# Altium PCB NEXUS32.PcbDoc (part 2 of 3)
Units mil, origin at the board's own origin, x right, y up, seen from the top; angles counter-clockwise.
Board outline 6299 x 4724 mil, 4 copper layers (Top Layer, L2_GND, L3_PWR, Bottom Layer), stack 63.6 mil thick; 220 components, 128 nets, 690 pads, 369 vias.
Unrouted connection lines stored in the file: 1.
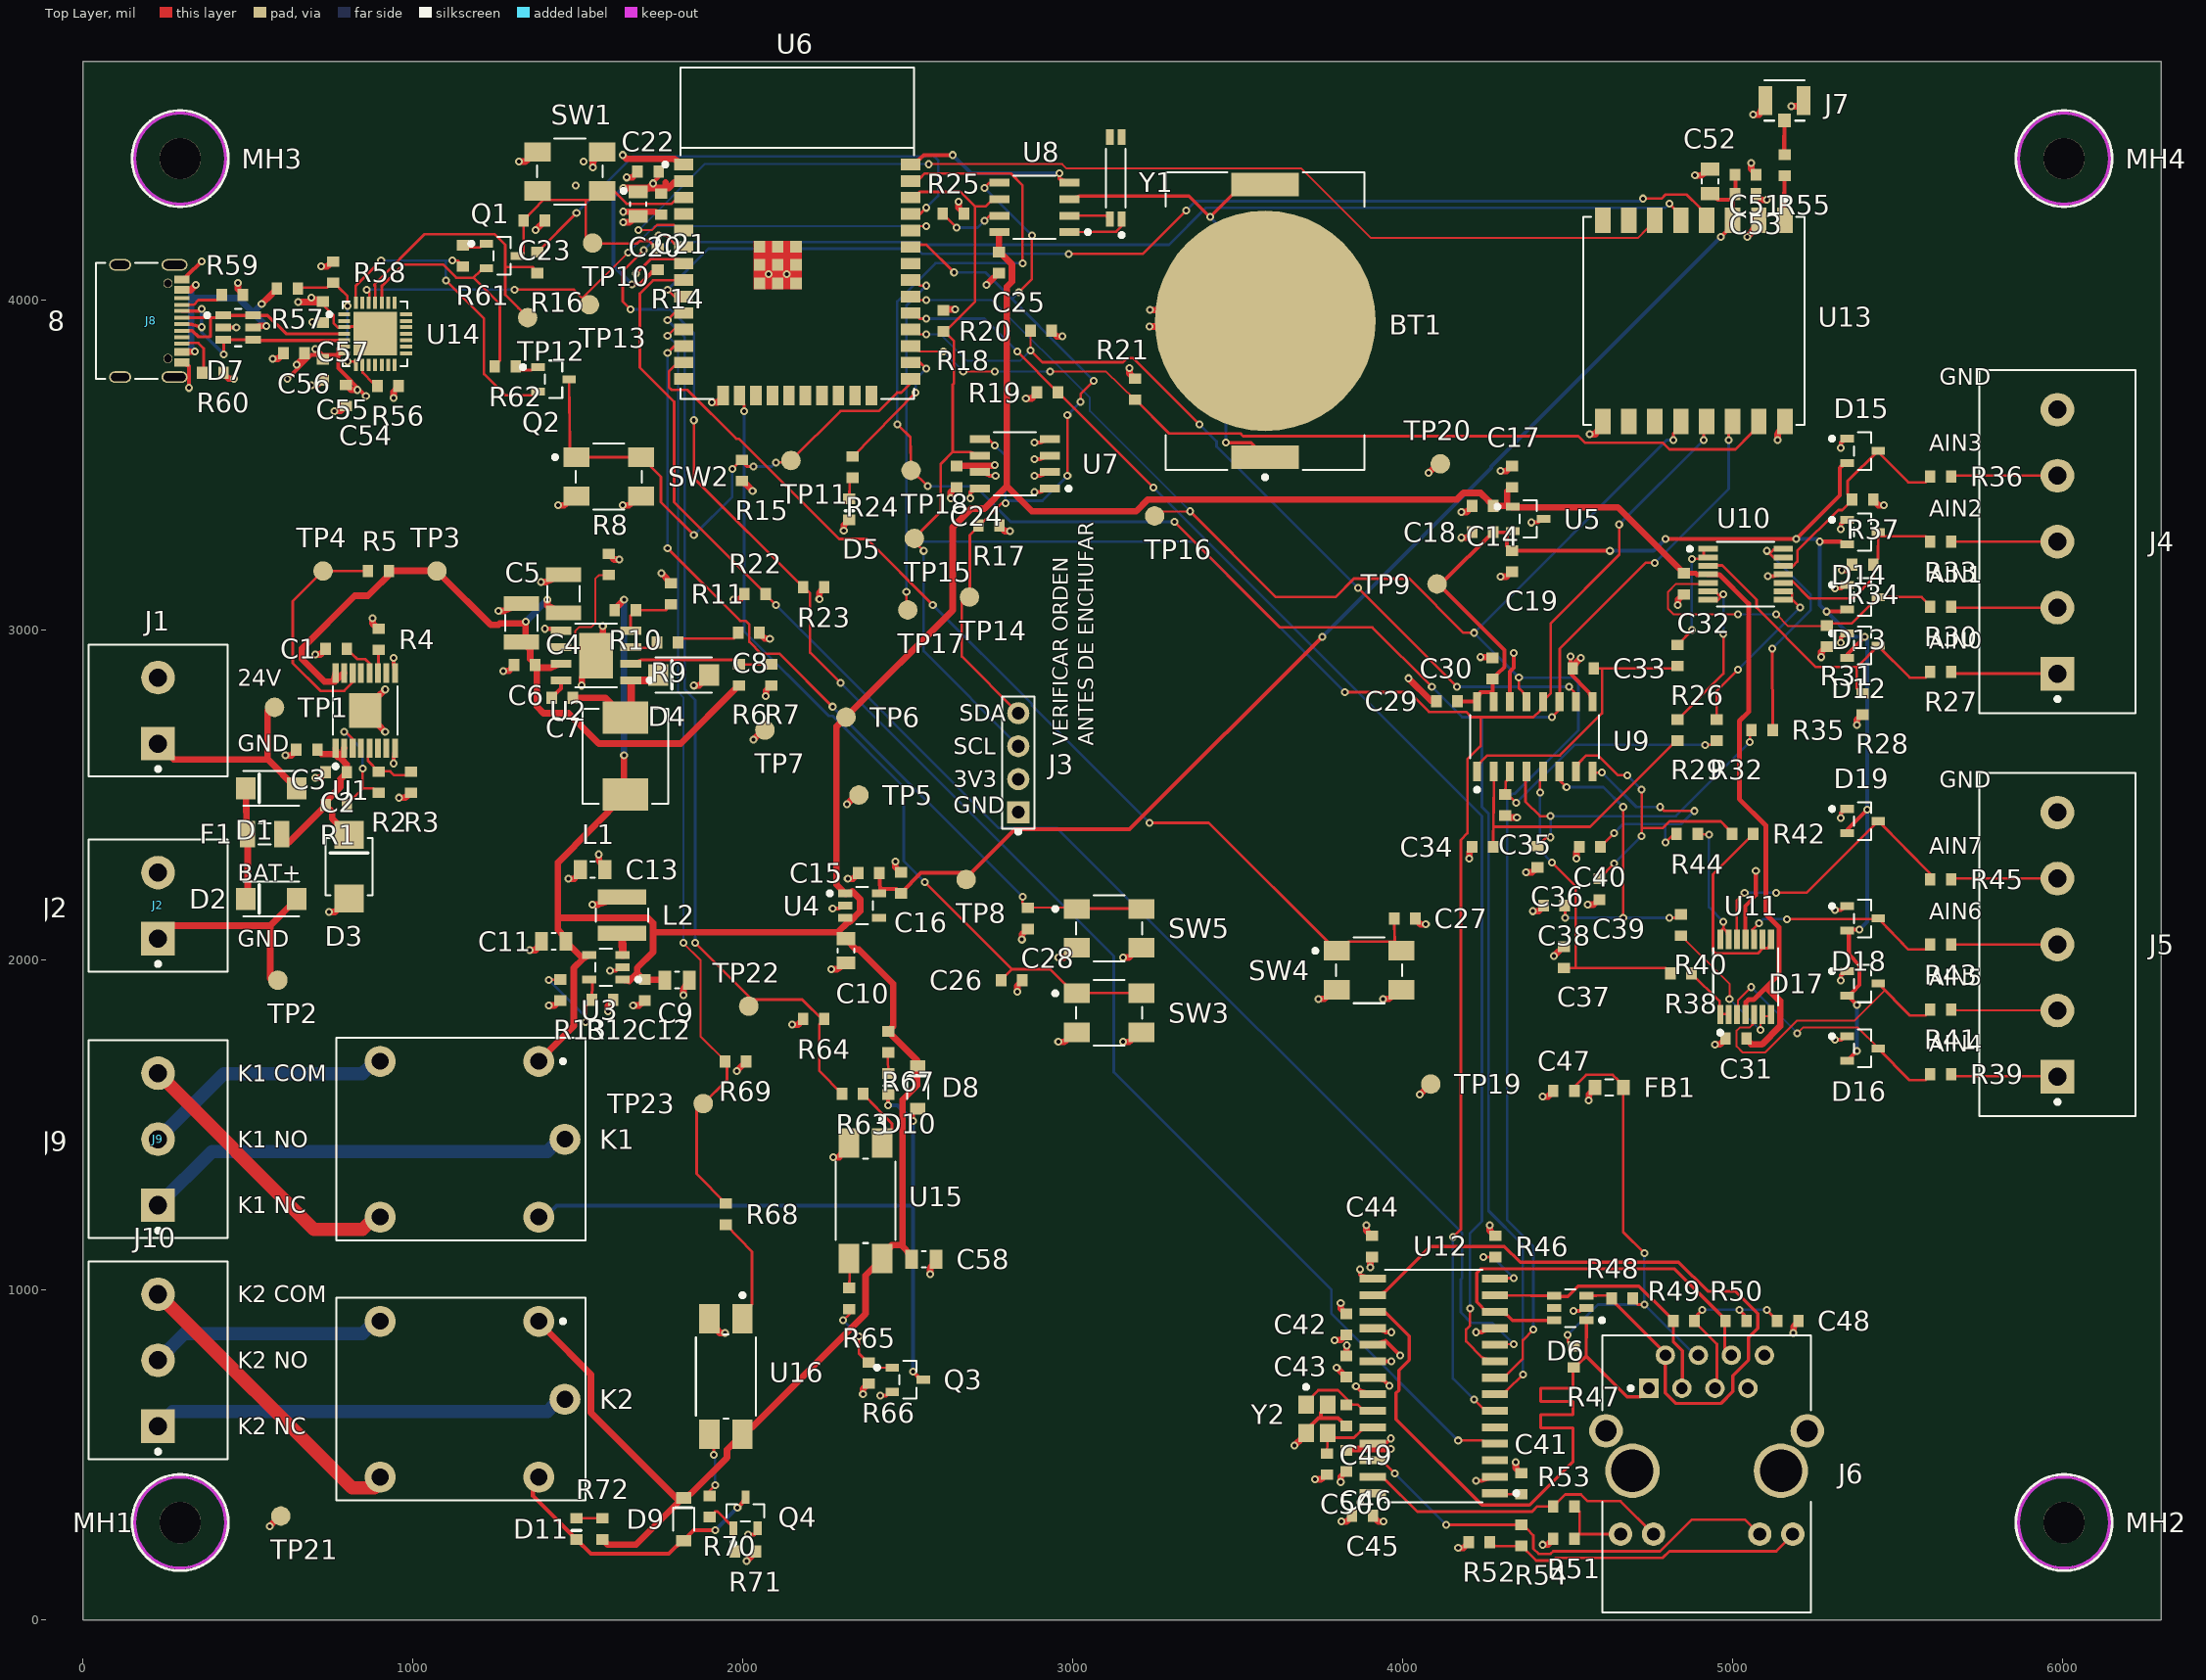
[diagram p0: Top Layer view]

## Part data (continued)
U13: "Modulo LoRa SX1276 803-930MHz SMD-16 (Ai-Thinker Ra-01H)", LCSC Part #=C503593, Manufacturer=Ai-Thinker, Datasheet=https://wmsc.lcsc.com/wmsc/upload/file/pdf/v2/lcsc/2004022132_Ai-Thinker-Ra-01H_C503593.pdf, Manufacturer Part Number=Ra-01H, Supplier 1=LCSC, Supplier Part Number 1=C503593
U14: "Puente USB a UART QFN-28 5x5 (Silicon Labs CP2102N-A02-GQFN28R)", LCSC Part #=C964632, Manufacturer="Silicon Labs", Datasheet=https://wmsc.lcsc.com/wmsc/upload/file/pdf/v2/lcsc/2304140030_SKYWORKS-SILICON-LABS-CP2102N-A02-GQFN28R_C964632.pdf, Manufacturer Part Number=CP2102N-A02-GQFN28R, Supplier 1=LCSC, Supplier Part Number 1=C964632
U15 U16: "Optoacoplador fototransistor 5kV SMD-4 (Sharp PC817X2CSP9F)", LCSC Part #=C66405, Manufacturer=Sharp, Datasheet=https://wmsc.lcsc.com/wmsc/upload/file/pdf/v2/lcsc/2304140030_Sharp-Microelectronics-PC817X2CSP9F_C66405.pdf, Manufacturer Part Number=PC817X2CSP9F, Supplier 1=LCSC, Supplier Part Number 1=C66405
Y1: library part XTAL_MC146, "Cristal 32.768kHz 12.5pF MC-146 (Epson Q13MC14620002); terminales #1 y #4, #2/#3 sin conexion", LCSC Part #=C15482, Manufacturer=Epson, Manufacturer Part Number=Q13MC14620002, Datasheet=https://wmsc.lcsc.com/wmsc/upload/file/pdf/v2/lcsc/2404180924_Seiko-Epson-Q13MC14620002_C15482.pdf, Supplier 1=LCSC, Supplier Part Number 1=C15482
Y2: library part XTAL_3225, "Cristal 25MHz 12pF SMD 3225 4 pads (YXC X322525MOB4SI); terminales 1 y 3, carcasa 2 y 4 a GND", LCSC Part #=C9006, Manufacturer="YXC (Yangxing Technology)", Manufacturer Part Number=X322525MOB4SI, Datasheet=https://wmsc.lcsc.com/wmsc/upload/file/pdf/v2/lcsc/2403291504_YXC-Crystal-Oscillators-X322525MOB4SI_C9006.pdf, Supplier 1=LCSC, Supplier Part Number 1=C9006

## Via types
v1: diameter 24, hole 12, Top Layer to Bottom Layer, tented both sides, 369 vias

## Nets (pads, with @x,y where several pads share a name; then routed paths per layer and width w, separated by ;. In a path a pad name is that pad's centre, name@x,y a point inside that pad or via, vN(x,y) a via of type N, cw(c..) or ccw(c..) an arc to the next point about the centre after c; other vN are vias at no path point)
AIN0: J4.1 R27.1 | length 323.2
  Top Layer w8: R27.1@5662,2874 5676,2868 J4.1@5984,2868
AIN0_DIV: D12.3 R27.2 R28.1 U10.3 | length 979.2
  Top Layer w8: U10.3@4925,3195 4952,3196 4968,3196 5072,3092 5072,3068 5252,2888 5376,2888 ; R28.1@5394,2808 5376,2824 5376,2888 ; D12.3@5440,2952 5536,2856 5584,2856 R27.2@5598,2874 ; D12.3@5441,2953 5376,2888
AIN1: J4.2 R30.1 | length 322.3
  Top Layer w8: R30.1@5662,3071 5676,3068 J4.2@5984,3068
AIN1_DIV: D13.3 R30.2 R31.1 U10.5 | length 1043.9
  Top Layer w6: U10.5@4925,3143 4896,3140 4828,3140 4804,3116 4804,3064 4820,3048 v1(5016,3048) ; v1(5132,3048) 5168,3012 R31.1@5284,3012
  Top Layer w8: R31.1@5285,3014 5300,3020 5360,3020 D13.3@5440,3100 ; D13.3@5441,3100 5572,3100 5584,3088 R30.2@5598,3071
  Bottom Layer w6: v1(5016,3048) v1(5132,3048)
AIN2: J4.3 R33.1 | length 322
  Top Layer w8: R33.1@5662,3268 5676,3268 J4.3@5984,3268
AIN2_DIV: D14.3 R33.2 R34.1 U10.10 | length 631.8
  Top Layer w8: U10.10@5153,3143 5180,3148 5232,3096 5364,3096 5428,3160 R34.1@5428,3200 ; R34.1@5426,3199 5440,3216 D14.3@5441,3297 ; 5440,3284 5584,3284 R33.2@5598,3268
AIN3: J4.4 R36.1 | length 322.3
  Top Layer w8: R36.1@5662,3465 5676,3468 J4.4@5984,3468
AIN3_DIV: D15.3 R36.2 R37.1 U10.12 | length 709.9
  Top Layer w8: U10.12@5153,3195 5180,3192 5196,3208 5196,3240 5320,3364 5332,3364 R37.1@5364,3396 ; R37.1@5362,3396 5348,3412 5348,3452 D15.3@5441,3543 ; D15.3@5440,3540 5532,3448 5584,3448 R36.2@5598,3465
AIN4: J5.1 R39.1 | length 323.2
  Top Layer w8: R39.1@5662,1654 5676,1648 J5.1@5984,1647
AIN4_DIV: D16.3 R39.2 U11.3 | length 783.5
  Top Layer w6: U11.3@5013,1835 5016,1864 5016,1878 v1(5056,1918) ; v1(5196,1778) 5214,1796 5378,1796 D16.3@5442,1732
  Top Layer w8: D16.3@5441,1732 5536,1636 5584,1636 R39.2@5598,1654
  Bottom Layer w6: v1(5056,1918) v1(5196,1778)
AIN5: J5.2 R41.1 | length 322.1
  Top Layer w8: R41.1@5662,1850 5676,1848 J5.2@5984,1847
AIN5_DIV: D17.3 R41.2 U11.5 | length 875.3
  Top Layer w6: U11.5@5065,1835 5062,1806 5052,1796 5022,1796 5012,1786 5012,1738 5030,1720 5098,1720 5194,1816 5368,1816 5460,1908
  Top Layer w8: D17.3@5441,1929 5536,1832 5584,1832 R41.2@5598,1850
AIN6: J5.3 R43.1 | length 322
  Top Layer w8: R43.1@5662,2047 5676,2048 J5.3@5984,2047
AIN6_DIV: D18.3 R43.2 U11.10 | length 626
  Top Layer w8: U11.10@5065,2063 5060,2092 v1(5080,2112) ; v1(5164,2124) D18.3@5440,2124 ; D18.3@5441,2126 5532,2032 5584,2032 R43.2@5598,2047
  Bottom Layer w8: v1(5080,2112) 5092,2124 v1(5164,2124)
AIN7: J5.4 R45.1 | length 322.6
  Top Layer w8: R45.1@5662,2244 5676,2248 J5.4@5984,2247
AIN7_DIV: D19.3 R45.2 U11.12 | length 886.8
  Top Layer w8: U11.12@5013,2063 5012,2092 5012,2180 v1(5036,2204) ; v1(5132,2204) 5224,2204 D19.3@5440,2420 ; D19.3@5441,2421 5600,2260 R45.2@5598,2244
  Bottom Layer w8: v1(5036,2204) v1(5132,2204)
ANT_CON: J7.1 R55.2 | length 104
  Top Layer w13: R55.2@5157,4441 5156,4456 J7.1@5157,4545
ANT_MOD: R55.1 U13.1 | length 135.1
  Top Layer w13: R55.1@5157,4377 5156,4280 U13.1@5158,4242
AOUT0: R26.1 U10.1 U10.2 | length 361.8
  Top Layer w8: R26.1@4833,2955 v1(4876,3000) ; v1(4876,3216) 4896,3216 U10.2@4925,3220 ; U10.2@4912,3220 4912,3240 U10.1@4925,3246
  Bottom Layer w8: v1(4876,3000) v1(4876,3216)
AOUT1: R29.1 U10.6 U10.7 | length 536.8
  Top Layer w8: R29.1@4833,2729 4972,2868 v1(4972,2988) ; U10.7@4925,3092 4952,3088 v1(4972,3108) ; U10.6@4925,3118 4952,3112 v1@4964,3100
  Bottom Layer w8: v1(4972,2988) v1(4972,3108)
AOUT2: R32.1 U10.8 U10.9 | length 552
  Top Layer w8: R32.1@4951,2729 4952,2816 v1(5016,2880) ; U10.8@5153,3092 U10.8@5180,3092 ; U10.9@5153,3118 5180,3112 U10.8@5180,3092 ; v1(5204,3068) U10.8@5180,3092
  Bottom Layer w8: v1(5016,2880) v1(5204,3068)
AOUT3: R35.1 U10.13 U10.14 | length 749.1
  Top Layer w8: v1(5104,3240) 5124,3220 U10.13@5153,3220 ; v1@5112,3232 5124,3244 U10.14@5153,3246 ; v1(5120,2944) R35.1@5121,2697
  Bottom Layer w8: v1(5104,3240) 5236,3108 5236,3060 v1(5120,2944)